# EAGLE board simulation (EAGLE 9.7.0)

Size 179.71 x 70.06 mm. Coordinates in mm from the lower left corner, seen from the top.
Outline: 0,0 179.71,0 179.71,70.06 0,70.06 0,0
Copper layers (1*16): Top 0.035mm / dielectric 1.5mm / Bottom 0.035mm
Design rules "default": minimum track width 6mil, minimum drill 0.35mm, track to track 6mil, track to pad 6mil, pad to pad 6mil, via to via 6mil, smd to smd 6mil, copper to edge 40mil, drill to drill 6mil, minimum pad ring 10mil, minimum via ring 8mil, stop-mask expansion 4mil, vias tented up to drill 0mil, thermal gap 10mil

## Footprints (pad centres in the part's own frame; a part is rotated, then mirrored left to right if it is on the bottom)
LEDRD254W60D565H860B = drill 0.981 pad 1.581: 1 -1.27,0; 2 1.27,0
LEDRD254W60D565H860B_G = drill 0.981 pad 1.581: 1 -1.27,0; 2 1.27,0
HC-SR04 = drill 1.016 long: 1 -3.81,0; 2 -1.27,0; 3 1.27,0; 4 3.81,0
RESAD1016W63L850D250B = drill 0.83 pad 1.43: 1 -5.08,0; 2 5.08,0
SG90 = drill 1.016 long: 1 -2.54,0; 2 0,0; 3 2.54,0
ARDUINO-UNO-R3-SHIELD = drill 1.016 pad 1.88: 3.3V 24.13,-2.54; 5V 24.13,0; A0 24.13,12.7; A1 24.13,15.24; A2 24.13,17.78; A3 24.13,20.32; A4 24.13,22.86; A5 24.13,25.4; AREF -24.13,-13.97; D2 -24.13,20.32; D3 -24.13,17.78; D4 -24.13,15.24; D5 -24.13,12.7; D6 -24.13,10.16; D7 -24.13,7.62; D8 -24.13,3.81; D9 -24.13,1.27; D10 -24.13,-1.27; D11 -24.13,-3.81; D12 -24.13,-6.35; D13 -24.13,-8.89; GND@0 24.13,2.54; GND@1 24.13,5.08; GND@2 -24.13,-11.43; IOREF 24.13,-7.62; NC 24.13,-10.16; RES 24.13,-5.08; RX -24.13,25.4; SCL -24.13,-19.05; SDA -24.13,-16.51; TX -24.13,22.86; VIN 24.13,7.62

## Placement (x,y rotation side)
D1  RED  [LEDRD254W60D565H860B]  95.77,39.1 180 top
D2  GREEN  [LEDRD254W60D565H860B_G]  103.39,39.1 180 top
DIST1  DISTANCE-SENSOR-4PINHC-SR04  [HC-SR04]  74.79,62.44 0 top
R1  330  [RESAD1016W63L850D250B]  104.66,31.48 90 top
R2  330  [RESAD1016W63L850D250B]  97.04,31.48 90 top
SERVOBASE  SERVOSG90  [SG90]  172.42,57.83 90 top
SERVOELBOW  SERVOSG90  [SG90]  172.42,22.68 90 top
SERVOGRIPPER  SERVOSG90  [SG90]  172.73,7.06 90 top
SERVOSHOULDER  SERVOSG90  [SG90]  172.39,40.18 90 top
U1  ARDUINO-UNO-R3-SHIELD  [ARDUINO-UNO-R3-SHIELD]  47.88,33.21 270 top

## Library data of the parts
D1 = Tinkercad; CATEGORY: Opto-Electronic; SUB-CATEGORY: LED; VALUE: LED_RED
D2 = Tinkercad; CATEGORY: Opto-Electronic; SUB-CATEGORY: LED; VALUE: LED_GREEN
DIST1 R1 R2 SERVOBASE SERVOELBOW SERVOGRIPPER SERVOSHOULDER U1 = Tinkercad

## Nets
D1_A: D1.1 R2.2
D2_A: D2.1 R1.2
U1_5V: DIST1.1 SERVOBASE.2 SERVOELBOW.2 SERVOGRIPPER.2 SERVOSHOULDER.2 U1.5V
U1_D2: DIST1.2 U1.D2
U1_D3: DIST1.3 U1.D3
U1_D5: SERVOBASE.3 U1.D5
U1_D6: SERVOSHOULDER.3 U1.D6
U1_D9: SERVOELBOW.3 U1.D9
U1_D10: SERVOGRIPPER.3 U1.D10
U1_D11: R2.1 U1.D11
U1_D12: R1.1 U1.D12
U1_GND: D1.2 D2.2 DIST1.4 SERVOBASE.1 SERVOELBOW.1 SERVOGRIPPER.1 SERVOSHOULDER.1 U1.A2 U1.GND@0 U1.GND@1 U1.GND@2

## Tracks (layer width: path | path; a pad name or v marks a point on that pad's centre or on a via)
D1_A  (1 unrouted)
D2_A  (1 unrouted)
U1_5V  (5 unrouted)
U1_D2  (1 unrouted)
U1_D3  (1 unrouted)
U1_D5  (1 unrouted)
U1_D6  (1 unrouted)
U1_D9  (1 unrouted)
U1_D10  (1 unrouted)
U1_D11  (1 unrouted)
U1_D12  (1 unrouted)
U1_GND  (10 unrouted)